# Altium PCB Sampler.PCBDOC (part 5 of 7)
Units mil, origin at the board's own origin, x right, y up, seen from the top; angles counter-clockwise.
Board outline 6299 x 3937 mil, 4 copper layers (Top, GP1(GND), L3, Bot), stack 64.883 mil thick; 567 components, 323 nets, 1698 pads, 817 vias.
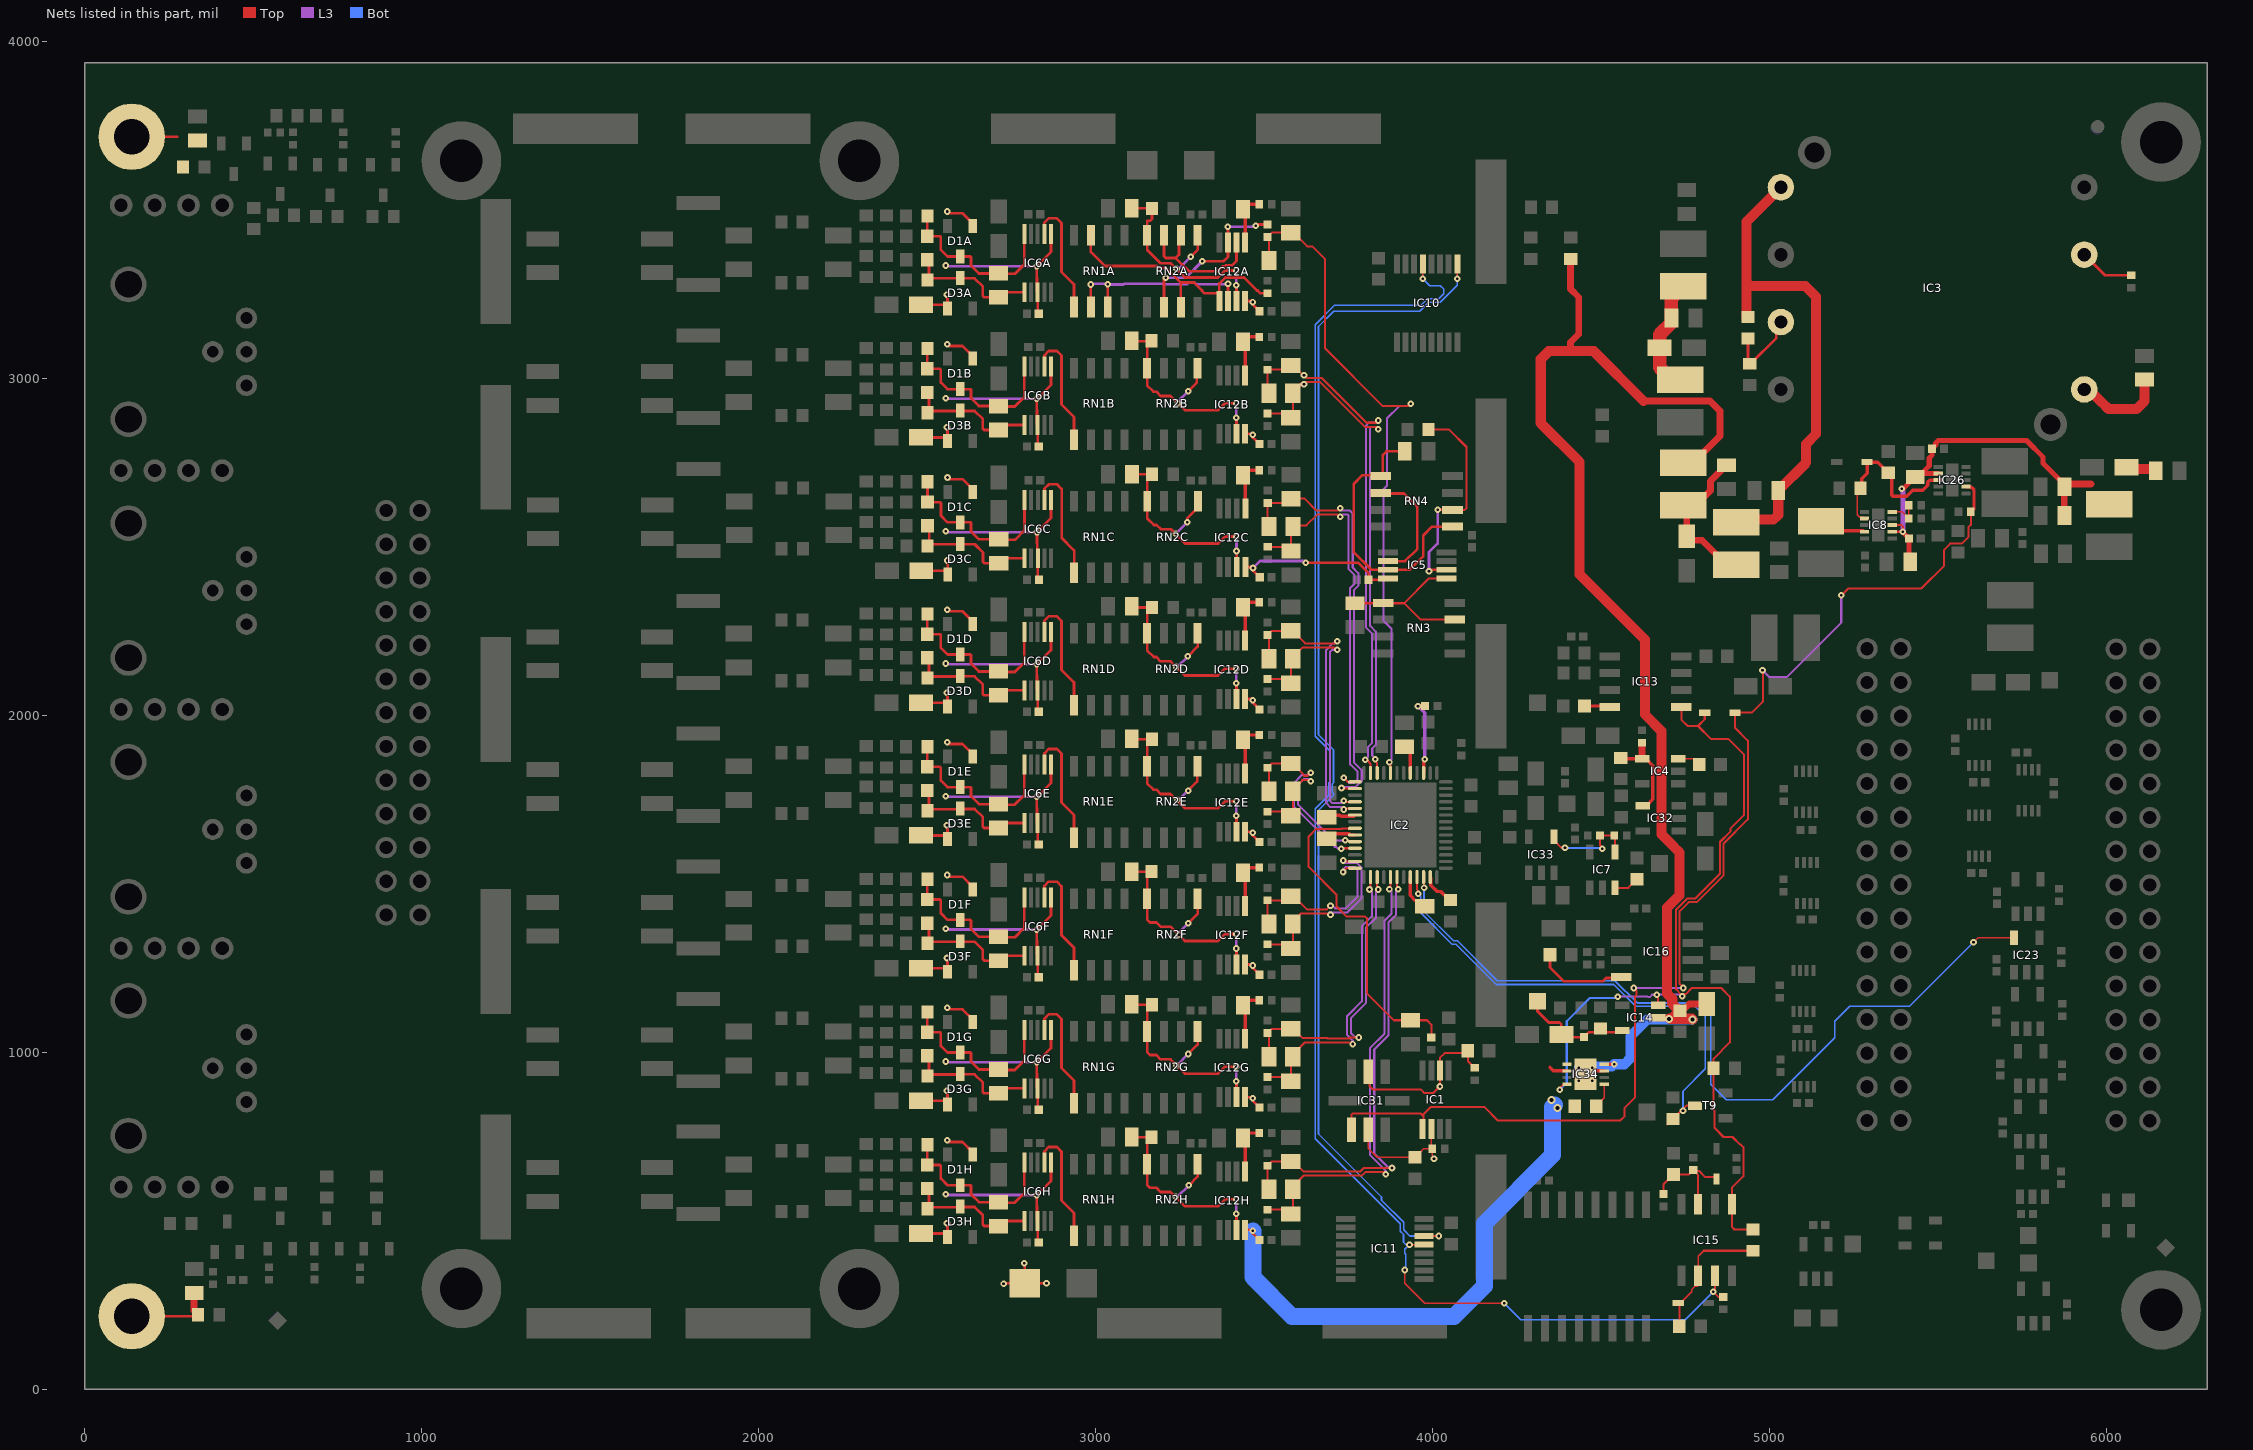
[diagram p6: the nets of this part, all layers, seen from the top]

## Via types
v1: diameter 19.68, hole 7.87, Top to Bot, tented both sides, 772 vias
v2: diameter 23.62, hole 11.81, Top to Bot, tented both sides, 17 vias
v3: diameter 19.68, hole 7.87, Top to Bot, 11 vias
v4: diameter 39.37, hole 23.62, Top to Bot, tented both sides, 7 vias
v5: diameter 23.62, hole 11.81, Top to Bot, 6 vias
v6: diameter 50, hole 28, Top to Bot, 4 vias

## Nets (pads, with @x,y where several pads share a name; then routed paths per layer and width w, separated by ;. In a path a pad name is that pad's centre, name@x,y a point inside that pad or via, vN(x,y) a via of type N, cw(c..) or ccw(c..) an arc to the next point about the centre after c; other vN are vias at no path point) (continued)
IN_0_P: C17A.1 C25A.1 IC2.48 R16A.2 | length 2032.5
  Top w6: C17A.1@3514.14,3349.46 3514.14,3415.6 R16A.2@3510.2,3419.54 3522.8,3432.13 C25A.1@3579.1,3432.13 3587.55,3432.13 3627.76,3391.92 3643.31,3391.92 3681.29,3353.94 3681.29,3088.63 3852.41,2917.51 3928.2,2917.51 v1(3935.04,2924.35) ; v1(3871.8,1861.22) 3874.8,1858.22 IC2.48@3874.8,1829.15
  L3 w6: v1(3871.8,1861.22) 3878.65,1868.06 3878.65,2256.2 3857.28,2277.56 3853.77,2281.07 3853.77,2670.94 3857.28,2674.45 3864.17,2681.34 3864.17,2880.95 3900.73,2917.51 3928.2,2917.51 v1(3935.04,2924.35)
IN_1_N: C17B.2 C23B.2 IC2.50 R14B.2 | length 1551.6
  Top w6: R14B.2@3510.2,2895.52 3566.5,2895.52 C23B.2@3579.1,2882.92 3585.01,2888.83 C17B.2@3585.01,2955.76 3607.28,2978.03 3607.28,2984.25 3617.49,2984.25 3618.29,2983.45 v1(3618.29,2982.43) 3625.5,2989.64 3665.35,2989.64 3798.7,2856.3 3831.74,2856.3 v1(3838.58,2849.46) ; v1(3829.72,1869.5) 3829.72,1863.93 3835.43,1858.22 IC2.50@3835.43,1829.15
  L3 w6: v1(3829.72,1869.5) 3829.72,1872.05 3820.87,1880.91 3820.87,1901.68 3831.59,1912.4 3831.59,2248.37 3814.54,2265.42 3814.54,2854.89 3815.94,2856.3 3831.74,2856.3 v1(3838.58,2849.46)
IN_1_P: C17B.1 C25B.1 IC2.51 R16B.2 | length 1576.6
  Top w6: C17B.1@3514.14,2955.76 3510.2,2959.69 R16B.2@3510.2,3025.83 3560.28,3025.83 3572.88,3038.43 C25B.1@3579.1,3038.43 3586.57,3038.43 3614.17,3010.83 3616.5,3010.83 v1(3618.47,3008.86) 3625.69,3001.64 3670.32,3001.64 3803.67,2868.3 3831.74,2868.3 v1(3838.58,2875.14) ; v1(3800.2,1868.11) 3805.86,1868.11 3810.88,1863.09 3810.88,1861.7 3815.75,1856.83 IC2.51@3815.75,1829.15
  L3 w6: v1(3800.2,1868.11) 3808.87,1876.78 3808.87,1906.65 3819.59,1917.37 3819.59,2243.4 3802.54,2260.45 3802.54,2859.86 3810.97,2868.3 3831.74,2868.3 v1(3838.58,2875.14)
IN_2_N: C17C.2 C23C.2 IC2.1 R14C.2 | length 1245.5
  Top w6: R14C.2@3510.7,2500.09 3567,2500.09 C23C.2@3579.6,2487.5 3579.6,2554.43 C17C.2@3585.5,2560.33 3585.5,2571.72 3593.25,2563.98 3625.45,2563.98 3657.35,2595.87 3718.55,2595.87 v1(3725.39,2589.03) ; v1(3736.22,1814.96) 3748.03,1803.15 3748.03,1802.57 IC2.1@3769.49,1802.57
  L3 w6: v1(3725.39,2589.03) 3732.24,2595.87 3749.02,2595.87 3750.98,2593.9 3750.98,2433.82 3767.72,2417.08 3767.72,2389.76 3758.86,2380.91 3755.34,2377.39 3755.34,1854.97 3777.62,1832.69 3777.62,1810.71 3765.65,1798.73 3752.45,1798.73 v1(3736.22,1814.96)
IN_2_P: C17C.1 C25C.1 IC2.2 R16C.2 | length 1277.2
  Top w6: C17C.1@3514.64,2560.33 3510.7,2564.27 R16C.2@3510.7,2630.41 3567,2630.41 C25C.1@3579.6,2643.01 3620.01,2643.01 3655.15,2607.87 3718.55,2607.87 v1(3725.39,2614.71) ; v1(3729.51,1784.54) 3735.61,1784.54 3737.25,1782.89 IC2.2@3769.49,1782.89
  L3 w6: v1(3725.39,2614.71) 3732.24,2607.87 3753.99,2607.87 3762.98,2598.87 3762.98,2438.79 3779.72,2422.06 3779.72,2384.79 3767.34,2372.42 3767.34,1859.94 3789.69,1837.6 3789.69,1805.8 3770.62,1786.73 3731.71,1786.73 v1(3729.51,1784.54)
IN_3_N: C17D.2 C23D.2 IC2.4 R14D.2 | length 845.9
  Top w6: R14D.2@3510.2,2108.12 3566.5,2108.12 C23D.2@3579.1,2095.52 3579.1,2162.45 C17D.2@3585.01,2168.35 3585.01,2171.62 3614.97,2201.58 3709.69,2201.58 v1(3716.54,2194.74) ; v1(3736.22,1746.52) 3739.22,1743.52 IC2.4@3769.49,1743.52
  L3 w6: v1(3716.54,2194.74) 3701.82,2194.74 3695.87,2188.79 3695.87,1745.58 3701.77,1739.68 3729.38,1739.68 v1(3736.22,1746.52)
IN_3_P: C17D.1 C25D.1 IC2.5 R16D.2 | length 893.5
  Top w6: C17D.1@3514.14,2168.35 3514.14,2234.5 R16D.2@3510.2,2238.43 3522.8,2251.03 C25D.1@3579.1,2251.03 3584.6,2251.03 3622.05,2213.58 3709.69,2213.58 v1(3716.54,2220.43) ; v1(3736.22,1720.83) 3739.22,1723.83 IC2.5@3769.49,1723.83
  L3 w6: v1(3716.54,2220.43) 3709.69,2213.58 3703.69,2213.58 3683.87,2193.76 3683.87,1740.61 3696.8,1727.68 3729.38,1727.68 v1(3736.22,1720.83)
IN_4_N: C17E.2 C23E.2 IC2.10 R14E.2 | length 513.1
  Top w6: R14E.2@3510.2,1714.42 3566.5,1714.42 C23E.2@3579.1,1701.82 3585.01,1707.72 C17E.2@3585.01,1774.65 3585.01,1778.91 3614.17,1808.07 ; 3613.14,1808.07 3614.17,1808.07 ; v1(3638.78,1804.18) 3634.89,1808.07 3614.17,1808.07
  L3 w6: v1(3638.78,1804.18) 3631.94,1811.02 3617.13,1811.02 3600.27,1794.17 3600.27,1735.87 3707.12,1629.02 v1(3740.34,1629.02)
IN_4_P: C17E.1 C25E.1 IC2.11 R16E.2 | length 590.6
  Top w6: C17E.1@3514.14,1774.65 3514.14,1840.8 R16E.2@3510.2,1844.73 3522.8,1857.33 C25E.1@3579.1,1857.33 3583.61,1857.33 3619.09,1821.85 3619.09,1820.87 3628.82,1820.87 3637.82,1829.87 v1(3638.78,1829.87) ; v1(3728.53,1604.41) 3729.84,1605.72 IC2.11@3769.49,1605.72
  L3 w6: v1(3638.78,1829.87) 3631.94,1823.02 3612.16,1823.02 3588.27,1799.14 3588.27,1730.9 3709.6,1609.57 3713.58,1609.57 3718.74,1604.41 v1(3728.53,1604.41)
IN_5_N: C17F.2 C23F.2 IC2.13 R14F.2 | length 586.1
  Top w6: R14F.2@3510.2,1320.72 3566.5,1320.72 C23F.2@3579.1,1308.12 3585.01,1314.02 C17F.2@3585.01,1380.95 3585.01,1389.14 3608.08,1412.21 3690.99,1412.21 3692.17,1413.39 v1(3697.03,1408.53) ; v1(3735.24,1569.35) 3738.24,1566.35 IC2.13@3769.49,1566.35
  L3 w6: v1@3692.17,1413.39 3693.95,1415.17 3747.1,1415.17 3789.56,1457.63 3789.56,1547.41 3774.46,1562.51 3742.08,1562.51 v1(3735.24,1569.35)
IN_5_P: C17F.1 C25F.1 IC2.14 R16F.2 | length 559.9
  Top w6: C17F.1@3514.14,1380.95 3510.2,1384.89 R16F.2@3510.2,1451.03 3566.5,1451.03 C25F.1@3579.1,1463.63 3587.55,1463.63 3626.97,1424.21 3686.02,1424.21 v1(3696.85,1435.04) ; v1(3734.25,1535.43) 3745.49,1546.67 IC2.14@3769.49,1546.67
  L3 w6: v1(3696.85,1435.04) 3702.76,1435.04 3710.63,1427.17 3742.13,1427.17 3777.56,1462.6 3777.56,1542.44 3769.49,1550.51 3742.08,1550.51 3734.25,1542.69 v1(3734.25,1535.43)
IN_6_N: C17G.2 C23G.2 IC2.16 R14G.2 | length 888.4
  Top w6: R14G.2@3510.2,927.02 3566.5,927.02 C23G.2@3579.1,914.42 3579.1,981.35 C17G.2@3585.01,987.25 3585.01,993.47 3620.87,1029.34 3687.99,1029.34 3688.48,1029.83 3757.8,1029.83 v1(3762.98,1024.66) ; v1(3812.75,1483.27) 3815.75,1486.27 IC2.16@3815.75,1520.09
  L3 w6: v1(3762.98,1024.66) 3762.98,1034.87 3748.83,1049.02 3745.31,1052.54 3745.31,1106.53 3748.83,1110.05 3790.17,1151.39 3790.17,1374.24 3819.59,1403.67 3819.59,1476.43 v1(3812.75,1483.27)
IN_6_P: C17G.1 C25G.1 IC2.17 R16G.2 | length 886.4
  Top w6: C17G.1@3514.14,987.25 3514.14,1053.39 R16G.2@3510.2,1057.33 3522.8,1069.93 C25G.1@3579.1,1069.93 3587.55,1069.93 3615.16,1042.32 3687.99,1042.32 3688.48,1041.83 3752.95,1041.83 3754.62,1043.5 3779.85,1043.5 v1(3780.7,1044.34) ; IC2.17@3835.43,1520.09 3835.43,1486.27 v1(3838.43,1483.27)
  L3 w6: v1(3780.7,1044.34) 3770.48,1044.34 3757.31,1057.51 3757.31,1101.56 3802.17,1146.42 3802.17,1369.27 3831.59,1398.7 3831.59,1476.43 v1(3838.43,1483.27)
IN_7_N: C17H.2 C23H.2 IC2.19 R14H.2 | length 1385.9
  Top w6: R14H.2@3510.2,533.31 3566.5,533.31 C23H.2@3579.1,520.72 3585.01,526.62 C17H.2@3585.01,593.55 3585.01,601.74 3618.38,635.11 3790.86,635.11 3801.37,645.62 3854.38,645.62 v1(3861.22,638.78) ; v1(3871.8,1484.25) 3874.8,1487.25 IC2.19@3874.8,1520.09
  L3 w6: v1(3861.22,638.78) 3861.22,648.46 3814.77,694.91 3814.77,1013.59 3857.09,1055.91 3857.09,1390.56 3878.65,1412.11 3878.65,1477.41 v1(3871.8,1484.25)
IN_7_P: C17H.1 C25H.1 IC2.20 R16H.2 | length 1384
  Top w6: C17H.1@3514.14,593.55 3510.2,597.49 R16H.2@3510.2,663.63 3522.8,676.23 C25H.1@3579.1,676.23 3582.1,673.23 3590.55,673.23 3616.67,647.11 3785.89,647.11 3796.4,657.62 3869.03,657.62 3869.71,656.94 v1(3879.38,656.94) ; IC2.20@3894.49,1520.09 3894.49,1487.25 v1(3897.49,1484.25)
  L3 w6: v1(3879.38,656.94) 3869.71,656.94 3826.77,699.88 3826.77,1008.62 3869.09,1050.94 3869.09,1385.59 3890.65,1407.14 3890.65,1477.41 v1(3897.49,1484.25)
N12V0A: C11A.2 C11B.2 C11C.2 C11D.2 C11E.2 C11F.2 C11G.2 C11H.2 C22.2 C41A.2 C41B.2 C41C.2 C41D.2 C41E.2 C41F.2 C41G.2 C41H.2 C46.2 C52.2 C71A.2 C71B.2 C71C.2 C71D.2 C71E.2 C71F.2 C71G.2 C71H.2 C83.2 D1A.1 D1B.1 D1C.1 D1D.1 D1E.1 D1F.1 D1G.1 D1H.1 D3A.1 D3B.1 D3C.1 D3D.1 D3E.1 D3F.1 D3G.1 D3H.1 D9.2 IC5.4 IC6A.3 IC6A.6 IC6B.3 IC6B.6 IC6C.3 IC6C.6 IC6D.3 IC6D.6 IC6E.3 IC6E.6 IC6F.3 IC6F.6 IC6G.3 IC6G.6 IC6H.3 IC6H.6 IC12A.4 IC12B.4 IC12C.4 IC12D.4 IC12E.4 IC12F.4 IC12G.4 IC12H.4 IC14.5 IC34.1 IC34.2 R32.2 TP9.1 | length 9093.8
  Top w8: C11H.2@2482.28,462.6 2549.82,462.6 D3H.1@2560.6,451.82 2560.6,491.19 v1(2559.06,492.73) ; C11G.2@2482.28,856.3 2549.82,856.3 D3G.1@2560.6,845.52 2560.6,884.89 v1(2559.06,886.43) ; C11F.2@2482.28,1250 2549.82,1250 D3F.1@2560.6,1239.22 2560.6,1278.59 v1(2559.06,1280.13) ; C11E.2@2482.28,1643.7 2549.82,1643.7 D3E.1@2560.6,1632.92 2560.6,1672.29 v1(2559.06,1673.83) ; C11D.2@2482.28,2037.4 2549.82,2037.4 D3D.1@2560.6,2026.62 2560.6,2065.99 v1(2559.06,2067.54) ; C11B.2@2482.28,2824.8 2549.82,2824.8 D3B.1@2560.6,2814.02 2560.6,2853.39 v1(2559.06,2854.94) ; C11A.2@2482.28,3218.5 2549.82,3218.5 D3A.1@2560.6,3207.72 2560.6,3247.09 v1(2559.06,3248.64) ; C11C.2@2482.78,2429.38 2550.31,2429.38 D3C.1@2561.09,2418.6 2561.09,2457.97 v1(2559.55,2459.51) ; v1(2560,739.09) 2565,734.09 2605,734.09 2635.4,703.69 D1H.1@2635.4,699.24 ; v1(2560,1132.8) 2565,1127.8 2605,1127.8 2635.4,1097.39 D1G.1@2635.4,1092.95 ; v1(2560,1526.5) 2565,1521.5 2605,1521.5 2635.4,1491.09 D1F.1@2635.4,1486.65 ; v1(2560,1920.2) 2565,1915.2 2605,1915.2 2635.4,1884.79 D1E.1@2635.4,1880.35 ; v1(2560,2313.9) 2565,2308.9 2605,2308.9 2635.4,2278.5 D1D.1@2635.4,2274.05 ; v1(2560,3101.3) 2565,3096.3 2605,3096.3 2635.4,3065.9 D1B.1@2635.4,3061.45 ; v1(2560,3495) 2565,3490 2605,3490 2635.4,3459.6 D1A.1@2635.4,3455.15 ; v1(2560.49,2705.87) 2565.49,2700.87 2605.49,2700.87 2635.9,2670.47 D1C.1@2635.9,2666.03 ; D1H.1@2635.4,696.37 D1H.1@2635.4,699.24 ; D1G.1@2635.4,1090.07 D1G.1@2635.4,1092.95 ; D1F.1@2635.4,1483.77 D1F.1@2635.4,1486.65 ; D1E.1@2635.4,1877.47 D1E.1@2635.4,1880.35 ; D1D.1@2635.4,2271.17 D1D.1@2635.4,2274.05 ; D1B.1@2635.4,3058.57 D1B.1@2635.4,3061.45 ; D1A.1@2635.4,3452.28 D1A.1@2635.4,3455.15 ; D1C.1@2635.9,2663.15 D1C.1@2635.9,2666.03 ; D1H.1@2638.23,701.09 2635.89,698.76 D1H.1@2635.4,699.24 ; D1G.1@2638.23,1094.8 2635.89,1092.46 D1G.1@2635.4,1092.95 ; D1F.1@2638.23,1488.5 2635.89,1486.16 D1F.1@2635.4,1486.65 ; D1E.1@2638.23,1882.2 2635.89,1879.86 D1E.1@2635.4,1880.35 ; D1D.1@2638.23,2275.9 2635.89,2273.56 D1D.1@2635.4,2274.05 ; D1B.1@2638.23,3063.3 2635.89,3060.96 D1B.1@2635.4,3061.45 ; D1A.1@2638.23,3457 2635.89,3454.66 D1A.1@2635.4,3455.15 ; D1C.1@2638.72,2667.87 2636.38,2665.54 D1C.1@2635.9,2666.03 ; v1(2726.87,313.24) 2728.59,314.96 D9.2@2789.37,314.96 ; v1(2788.39,374.02) 2788.39,375 2789.37,374.02 D9.2@2789.37,314.96 ; C41H.2@2825.64,441.66 C41H.2@2828,439.3 ; C41G.2@2825.64,835.36 C41G.2@2828,833 ; C41F.2@2825.64,1229.06 C41F.2@2828,1226.7 ; C41E.2@2825.64,1622.76 C41E.2@2828,1620.4 ; C41D.2@2825.64,2016.47 C41D.2@2828,2014.1 ; C41B.2@2825.64,2803.87 C41B.2@2828,2801.5 ; C41A.2@2825.64,3197.57 C41A.2@2828,3195.2 ; C41C.2@2826.13,2408.44 C41C.2@2828.49,2406.08 ; C41H.2@2831.54,435.76 C41H.2@2828,439.3 ; C41G.2@2831.54,829.46 C41G.2@2828,833 ; C41F.2@2831.54,1223.16 C41F.2@2828,1226.7 ; C41E.2@2831.54,1616.86 C41E.2@2828,1620.4 ; C41D.2@2831.54,2010.56 C41D.2@2828,2014.1 ; C41B.2@2831.54,2797.96 C41B.2@2828,2801.5 ; C41A.2@2831.54,3191.66 C41A.2@2828,3195.2 ; C41C.2@2832.04,2402.54 C41C.2@2828.49,2406.08 ; v1(2854.33,314.96) D9.2@2789.37,314.96 ; IC6H.6@2867.37,672.71 2867.37,618.76 v1(2825.64,577.02) 2825.64,544.09 2826.1,543.63 2826.1,501.38 IC6H.3@2828,499.48 C41H.2@2828,439.3 ; IC6G.6@2867.37,1066.41 2867.37,1012.46 v1(2825.64,970.72) 2825.64,937.8 2826.1,937.33 2826.1,895.08 IC6G.3@2828,893.18 C41G.2@2828,833 ; IC6F.6@2867.37,1460.11 2867.37,1406.16 v1(2825.64,1364.42) 2825.64,1331.5 2826.1,1331.03 2826.1,1288.78 IC6F.3@2828,1286.88 C41F.2@2828,1226.7 ; IC6E.6@2867.37,1853.81 2867.37,1799.86 v1(2825.64,1758.12) 2825.64,1725.2 2826.1,1724.73 2826.1,1682.48 IC6E.3@2828,1680.58 C41E.2@2828,1620.4 ; IC6D.6@2867.37,2247.51 2867.37,2193.56 v1(2825.64,2151.83) 2825.64,2118.9 2826.1,2118.43 2826.1,2076.18 IC6D.3@2828,2074.28 C41D.2@2828,2014.1 ; IC6B.6@2867.37,3034.92 2867.37,2980.96 v1(2825.64,2939.23) 2825.64,2906.3 2826.1,2905.84 2826.1,2863.59 IC6B.3@2828,2861.69 C41B.2@2828,2801.5 ; IC6A.6@2867.37,3428.61 2867.37,3374.66 v1(2825.64,3332.93) 2825.64,3300 2826.1,3299.54 2826.1,3257.29 IC6A.3@2828,3255.39 C41A.2@2828,3195.2 ; IC6C.6@2867.86,2639.49 2867.86,2585.54 v1(2826.13,2543.8) 2826.13,2510.87 2826.59,2510.41 2826.59,2468.16 IC6C.3@2828.49,2466.26 C41C.2@2828.49,2406.08 ; IC12H.4@3443.9,473.57 3463.44,473.57 v1(3466.54,470.47) 3466.54,462.6 C71H.2@3486.22,442.91 ; IC12G.4@3443.9,867.27 3463.44,867.27 v1(3466.54,864.17) 3466.54,856.3 C71G.2@3486.22,836.61 ; IC12F.4@3443.9,1260.97 3463.44,1260.97 v1(3466.54,1257.87) 3466.54,1250 C71F.2@3486.22,1230.31 ; IC12E.4@3443.9,1654.67 3463.44,1654.67 v1(3466.54,1651.57) 3466.54,1643.7 C71E.2@3486.22,1624.02 ; IC12D.4@3443.9,2048.37 3463.44,2048.37 v1(3466.54,2045.28) 3466.54,2037.4 C71D.2@3486.22,2017.72 ; IC12B.4@3443.9,2835.77 3463.44,2835.77 v1(3466.54,2832.68) 3466.54,2824.8 C71B.2@3486.22,2805.12 ; IC12A.4@3443.9,3229.47 3463.44,3229.47 v1(3466.54,3226.38) 3466.54,3218.5 C71A.2@3486.22,3198.82 ; IC12C.4@3444.39,2440.35 3463.93,2440.35 v1(3467.03,2437.25) 3467.03,2429.38 C71C.2@3486.71,2409.69 ; v1(3623.03,2452.76) 3779.53,2452.76 3811.02,2421.26 3810.04,2420.28 C22.2@3810.04,2402.56 3864.17,2402.56 IC5.4@3868.11,2406.5 ; TP9.1@4311.02,1151.57 4311.02,1122.05 4344.49,1088.58 4375.98,1088.58 4381.89,1082.68 C52.2@4381.89,1053.15 4389.76,1045.28 C46.2@4448.82,1045.28 4463.05,1059.5 4552.53,1059.5 IC14.5@4557.99,1064.96
  Top w10: 4348.42,955.72 4348.42,954.87 4358.27,945.03 IC34.2@4398.62,945.03
  L3 w8: v1(2555,579.09) 2557.07,577.02 v1(2825.64,577.02) ; v1(2555,972.8) 2557.07,970.72 v1(2825.64,970.72) ; v1(2555,1366.5) 2557.07,1364.42 v1(2825.64,1364.42) ; v1(2555,1760.2) 2557.07,1758.12 v1(2825.64,1758.12) ; v1(2555,2153.9) 2557.07,2151.83 v1(2825.64,2151.83) ; v1(2555,2941.3) 2557.07,2939.23 v1(2825.64,2939.23) ; v1(2555,3335) 2557.07,3332.93 v1(2825.64,3332.93) ; v1(2555.49,2545.87) 2557.57,2543.8 v1(2826.13,2543.8) ; v1(3467.03,2437.25) 3487.84,2458.06 3617.72,2458.06 v1(3623.03,2452.76)
  Bot w50: v1(3466.54,470.47) 3466.54,332.68 3583.15,216.06 4063.25,216.06 4153.54,306.36 4153.54,492.62 4356.05,695.13 4356.05,838.33 4361.22,843.5
  other v2: 4371.11,834.99 4352.36,859.33
N13V0: C19.2 C44.2 IC14.2 IC34.7 IC34.8 IC34.9 L13.2 R6.2 | length 3985.7
  Top w10: v3(4473.43,954.87) 4473.43,952.82 4481.22,945.03 IC34.7@4508.86,945.03 ; IC34.8@4508.86,964.71 v1(4538.58,964.71)
  Top w20: 4409.45,3080.71 4409.45,3107.18 4433.54,3131.27 4433.54,3240.77 4409.45,3264.87 R6.2@4409.45,3354.33 ; 4625.98,2933.07 4822.83,2933.07 4852.36,2903.54 4852.36,2828.74 4773.62,2750 L13.2@4744.09,2750 ; IC14.2@4669.29,1102.36 v2@4703.74,1102.36 ; C44.2@4735.24,1124.02 4741.82,1124.02 4761.5,1143.7 C19.2@4812.99,1143.7
  Top w30: 4625.98,2933.07 4478.35,3080.71 4409.45,3080.71 4344.49,3080.71 4320.87,3057.09 4320.87,2867.13 4435.71,2752.28 4435.71,2418.62 4629.92,2224.41 4629.92,2002.67 4679.38,1953.21 4679.38,1647.05 4717.95,1608.47 4717.95,1608.02 4732.28,1593.69 4732.28,1466.21 4695.41,1429.33 4695.41,1174.41 4710.94,1158.87 4710.94,1144.73 4731.66,1124.02 4733.27,1124.02 4709.65,1100.39 4703.74,1100.39 4704.41,1099.72 4769.6,1099.72 v2(4771.53,1097.79)
  Bot w30: v3(4434.06,954.87) v3(4473.43,954.87) v3@4473.43,962.74 ; 4487.18,958.55 4532.42,958.55 v1(4538.58,964.71) 4569.04,964.71 4586.61,982.29 4586.61,1047.41 4636.99,1097.79 v2(4771.53,1097.79)
  other v2: 4701.67,1098.63
  other v3: 4434.06,915.5 4473.43,915.5
N13V0S: C40.2 IC3.4 L12.1 R19.1 | length 1683.1
  Top w8: L12.1@4901.58,2572.83 5003.94,2572.83 5011.81,2580.71 5019.68,2588.58 5019.68,2661.42 C40.2@5025.59,2667.32
  Top w30: L12.1@4901.58,2572.83 4909.45,2580.71 5011.81,2580.71 ; R19.1@4931.1,3181.1 4933.82,3183.82 R19.1@4935.79,3183.82 ; R19.1@4935.79,3181.86 4933.82,3181.86 4932.84,3182.84 4931.1,3184.58 4931.1,3285.43 ; 5019.68,2588.58 5025.59,2594.49 C40.2@5025.59,2667.32 5108.27,2750 5108.27,2805.12 5137.8,2834.65 5137.8,3242.32 5106.5,3273.62 4942.91,3273.62 4931.1,3285.43 ; IC3.4@5033.46,3567.13 4931.1,3464.76 4931.1,3285.43
NetB1_1: B1.1 C78.1 R75.2 | length 134.1
  Top w8: B1.1@140,3717 274.14,3717
NetB2_1: B2.1 C79.1 R76.2 | length 268.4
  Top w8: B2.1@140,217 332.22,217 R76.2@336.68,221.46
  Top w20: C79.1@324.8,286.42 324.8,233.33 R76.2@336.68,221.46
NetC1_2: C1.2 IC1.2 IC31.2 R15.2 | length 358.7
  Top w5: IC31.2@3809.06,769.83 3809.06,714.76 3835.38,688.44 3948.62,688.44 3964.82,704.64 3964.82,705.62 3973.11,713.91 R15.2@3992.91,713.91 ; IC1.2@3996.06,772.64 3996.06,717.06 R15.2@3992.91,713.91 ; v1(4003.94,684.2) 4003.94,688.18 3998.73,693.38 R15.2@3998.73,713.91 R15.2@3992.91,713.91
NetC12_2: C12.2 IC2.8 R1.2 | length 984.7
  Top w6: IC2.8@3769.49,1664.78 3732.12,1664.78 3730.31,1662.98 3654.17,1662.98 3631.89,1640.7 3631.89,1550.82 3714.69,1468.02 3714.69,1432.94 3744.87,1402.77 3800.02,1402.77 3804.71,1398.09 3804.71,1175.61 3884.97,1095.35 C12.2@3934.24,1095.35 3983.39,1095.35 3996.24,1082.5 R1.2@3996.24,1044.42
NetC13_2: C13.2 IC2.22 | length 95.8
  Top w10: IC2.22@3933.86,1520.09 3933.86,1465.77 3949.02,1450.6 3962.55,1450.6 C13.2@3967.17,1445.98
NetC14_2: C14.2 IC2.9 | length 91.5
  Top w10: C14.2@3686.02,1633.32 3701.56,1648.86 3752.14,1648.86 3755.91,1645.09 IC2.9@3769.49,1645.09
NetC15_2: C15.2 IC2.6 | length 88.9
  Top w10: C15.2@3686.02,1697.46 3692.72,1704.15 3724.84,1704.15 3728,1700.99 3766.33,1700.99 IC2.6@3769.49,1704.15
NetC16_2: C16.2 IC2.45 | length 85.3
  Top w10: C16.2@3916.17,1907.12 3933.86,1889.43 IC2.45@3933.86,1829.15
NetC18_2: C18.2 C42.2 L12.2 L13.1 | length 472.3
  Top w20: L13.1@4744.09,2624.02 L13.1@4763.78,2624.02 ; C42.2@4872.05,2742.13 4824.8,2694.88 4824.8,2667.32 4781.5,2624.02 L13.1@4763.78,2624.02 ; L12.2@4901.58,2446.85 4872.05,2446.85 4799.21,2519.68 4765.75,2519.68 C18.2@4753.94,2531.5 4753.94,2614.17 L13.1@4763.78,2624.02
NetC27_2: C27.2 C28.1 L10.2 L11.1 | length 346.6
  Top w40: L11.1@4734.25,2996.06 4709.65,2996.06 4673.23,3032.48 C28.1@4673.23,3090.55 4673.23,3129.92 4708.66,3165.35 C27.2@4708.66,3179.13 4708.66,3238.19 L10.2@4744.09,3273.62
NetC32_2: C32.2 C34.2 C36.2 C39.2 C49.1 C63.2 C64.2 C122.2 C123.2 IC3.1 IC8.2 IC8.3 IC26.2 L6.2 | length 1543.4
  Top w6: IC8.2@5364.05,2544.87 v1(5395.15,2544.87) 5395.15,2561.02 5391.61,2564.56 IC8.3@5364.05,2564.56
  Top w15: v1(5391.6,2672.82) 5396.82,2672.82 C123.2@5431.69,2707.69 5440.97,2707.69 C123.2@5451.17,2717.9 ; v1(5395.15,2544.87) 5395.15,2543.3 C63.2@5413.26,2525.19 5413.26,2460.23 C64.2@5417.2,2456.29 ; IC26.2@5499.94,2717.9 C123.2@5451.17,2717.9 ; C36.2@5874.37,2678 5874.37,2684.89 5811.66,2747.6 5811.66,2766.1 5762.11,2815.64 5500.21,2815.64 5492.89,2808.32 5492.89,2801.67 C122.2@5482.16,2790.94 5482.16,2772.24 5473.66,2763.74 5473.66,2740.38 C123.2@5451.17,2717.9
  Top w20: C39.2@5874.37,2593 C36.2@5874.37,2678 5882.7,2686.33 5953.37,2686.33
  Top w30: IC3.1@5933.46,2967.13 5946.65,2967.13 5983.9,2929.87 5984.79,2929.87 6006,2908.66 6088.55,2908.66 6112.2,2932.31 C32.2@6112.2,2996.06 ; C49.1@6048.39,2736.22 C49.1@6059.21,2736.22 6064.13,2731.3 6140.75,2731.3 C34.2@6145.67,2726.38
  L3 w15: v1(5391.6,2672.82) 5391.6,2671.55 5395.15,2668 v1(5395.15,2544.87)
NetC47_1: C47.1 IC7.3 | length 75.6
  Top w6: IC7.3@4541.36,1488.16 4580.68,1488.16 C47.1@4606.3,1513.78
NetC65_1: C65.1 IC13.4 | length 75.7
  Top w8: C65.1@4450.79,2027.56 4523.37,2027.56 IC13.4@4525.55,2025.37
NetC66_2: C66.2 D5.2 IC15.6 R52.1 | length 411.6
  Top w5: C66.2@4732.28,187.01 4732.28,252.36 D5.2@4728.74,255.91 4735.24,255.91 4769.07,289.74 4769.07,296.55 4779.23,306.71 4786.04,306.71 4787.99,308.66 IC15.6@4787.99,336.61 4787.99,395.28 4804.13,411.42
  Top w6: 4804.13,411.42 R52.1@4950.79,411.42
NetC68_2: C68.2 D2.2 IC15.3 R22.2 R48.2 | length 317.8
  Top w6: R48.2@4685.04,579.53 4685.04,608.27 C68.2@4714.57,637.8 4760.63,637.8 R22.2@4773.62,650.79 ; IC15.3@4787.99,549.21 4787.99,635.24 4774.61,648.62 4790.35,648.62 4809.06,629.92 4837.01,629.92 D2.2@4842.52,624.41
NetC69_2: C69.2 D4.2 IC8.7 IC26.3 R56.1 | length 514.1
  Top w5: R56.1@5269.56,2673.81 5270.54,2672.83 5273,2672.83 5275.46,2672.83 5273,2670.37 5260.09,2657.45 5260.09,2594.92 5267.36,2587.65 5277.96,2587.65 IC8.7@5281.37,2584.24
  Top w10: R56.1@5269.56,2673.81 5272.02,2676.27 5273.78,2678.03 5273.78,2702.64 5289.13,2717.98 5289.13,2751.29 D4.2@5288.85,2751.57 ; D4.2@5289.13,2751.57 5320.74,2751.57 C69.2@5352.24,2720.07 5362.08,2710.23 5362.08,2653.14 5365.11,2650.11 5406.79,2650.11 5424.75,2668.06 5454.43,2668.06 5469.25,2682.88 5469.25,2692.51 5474.95,2698.21 IC26.3@5499.94,2698.21
NetC72A_1: C72A.1 C88A.2 D3A.3 IC6A.1 R42A.2 | length 381.5
  Top w8: C88A.2@2505.43,3347.24 2505.43,3296.69 2596.42,3296.69 D3A.3@2596.66,3296.94 ; D3A.3@2598,3298.27 D3A.3@2596.66,3296.94 ; IC6A.1@2788.63,3255.39 2726.82,3255.39 C72A.1@2712,3240.57 2669.49,3240.57 2665.27,3244.79 2665.27,3272.61 2640.94,3296.94 D3A.3@2596.66,3296.94
NetC72A_2: C72A.2 C85A.2 D1A.3 IC6A.10 R34A.2 | length 532.7
  Top w8: R34A.2@2500.71,3481.97 C85A.2@2500.71,3421.97 2537.76,3421.97 2540.91,3418.81 2540.91,3381.41 2560.6,3361.72 D1A.3@2598,3361.72 2628.28,3361.72 2630,3360 2630,3335 2653.57,3311.43 C72A.2@2712,3311.43 2713.43,3310 2760,3310 2788.63,3338.63 IC6A.10@2788.63,3428.61
NetC72B_1: C72B.1 C88B.2 D3B.3 IC6B.1 R42B.2 | length 381.5
  Top w8: C88B.2@2505.43,2953.54 2505.43,2902.99 2596.42,2902.99 D3B.3@2596.66,2903.24 ; D3B.3@2598,2904.57 D3B.3@2596.66,2903.24 ; IC6B.1@2788.63,2861.69 2726.82,2861.69 C72B.1@2712,2846.87 2669.49,2846.87 2665.27,2851.08 2665.27,2878.91 2640.94,2903.24 D3B.3@2596.66,2903.24
NetC72B_2: C72B.2 C85B.2 D1B.3 IC6B.10 R34B.2 | length 532.7
  Top w8: R34B.2@2500.71,3088.27 C85B.2@2500.71,3028.27 2537.76,3028.27 2540.91,3025.11 2540.91,2987.71 2560.6,2968.02 D1B.3@2598,2968.02 2628.28,2968.02 2630,2966.3 2630,2941.3 2653.57,2917.73 C72B.2@2712,2917.73 2713.43,2916.3 2760,2916.3 2788.63,2944.93 IC6B.10@2788.63,3034.92
NetC72C_1: C72C.1 C88C.2 D3C.3 IC6C.1 R42C.2 | length 381.5
  Top w8: C88C.2@2505.93,2558.12 2505.93,2507.57 2596.91,2507.57 D3C.3@2597.16,2507.81 ; D3C.3@2598.49,2509.15 D3C.3@2597.16,2507.81 ; IC6C.1@2789.12,2466.26 2727.31,2466.26 C72C.1@2712.49,2451.44 2669.98,2451.44 2665.76,2455.66 2665.76,2483.48 2641.43,2507.81 D3C.3@2597.16,2507.81
NetC72C_2: C72C.2 C85C.2 D1C.3 IC6C.10 R34C.2 | length 532.7
  Top w8: R34C.2@2501.2,2692.84 C85C.2@2501.2,2632.84 2538.25,2632.84 2541.41,2629.69 2541.41,2592.29 2561.09,2572.6 D1C.3@2598.49,2572.6 2628.77,2572.6 2630.49,2570.87 2630.49,2545.87 2654.06,2522.31 C72C.2@2712.49,2522.31 2713.93,2520.87 2760.49,2520.87 2789.12,2549.5 IC6C.10@2789.12,2639.49
NetC72D_1: C72D.1 C88D.2 D3D.3 IC6D.1 R42D.2 | length 381.5
  Top w8: C88D.2@2505.43,2166.14 2505.43,2115.59 2596.42,2115.59 D3D.3@2596.66,2115.83 ; D3D.3@2598,2117.17 D3D.3@2596.66,2115.83 ; IC6D.1@2788.63,2074.28 2726.82,2074.28 C72D.1@2712,2059.46 2669.49,2059.46 2665.27,2063.68 2665.27,2091.5 2640.94,2115.83 D3D.3@2596.66,2115.83
NetC72D_2: C72D.2 C85D.2 D1D.3 IC6D.10 R34D.2 | length 532.7
  Top w8: R34D.2@2500.71,2300.87 C85D.2@2500.71,2240.87 2537.76,2240.87 2540.91,2237.71 2540.91,2200.31 2560.6,2180.62 D1D.3@2598,2180.62 2628.28,2180.62 2630,2178.9 2630,2153.9 2653.57,2130.33 C72D.2@2712,2130.33 2713.43,2128.9 2760,2128.9 2788.63,2157.53 IC6D.10@2788.63,2247.51
NetC72E_1: C72E.1 C88E.2 D3E.3 IC6E.1 R42E.2 | length 381.5
  Top w8: C88E.2@2505.43,1772.44 2505.43,1721.89 2596.42,1721.89 D3E.3@2596.66,1722.13 ; D3E.3@2598,1723.47 D3E.3@2596.66,1722.13 ; IC6E.1@2788.63,1680.58 2726.82,1680.58 C72E.1@2712,1665.76 2669.49,1665.76 2665.27,1669.98 2665.27,1697.8 2640.94,1722.13 D3E.3@2596.66,1722.13
NetC72E_2: C72E.2 C85E.2 D1E.3 IC6E.10 R34E.2 | length 532.7
  Top w8: R34E.2@2500.71,1907.17 C85E.2@2500.71,1847.17 2537.76,1847.17 2540.91,1844.01 2540.91,1806.61 2560.6,1786.92 D1E.3@2598,1786.92 2628.28,1786.92 2630,1785.2 2630,1760.2 2653.57,1736.63 C72E.2@2712,1736.63 2713.43,1735.2 2760,1735.2 2788.63,1763.83 IC6E.10@2788.63,1853.81
NetC72F_1: C72F.1 C88F.2 D3F.3 IC6F.1 R42F.2 | length 381.5
  Top w8: C88F.2@2505.43,1378.74 2505.43,1328.19 2596.42,1328.19 D3F.3@2596.66,1328.43 ; D3F.3@2598,1329.77 D3F.3@2596.66,1328.43 ; IC6F.1@2788.63,1286.88 2726.82,1286.88 C72F.1@2712,1272.06 2669.49,1272.06 2665.27,1276.28 2665.27,1304.1 2640.94,1328.43 D3F.3@2596.66,1328.43
NetC72F_2: C72F.2 C85F.2 D1F.3 IC6F.10 R34F.2 | length 532.7
  Top w8: R34F.2@2500.71,1513.47 C85F.2@2500.71,1453.47 2537.76,1453.47 2540.91,1450.31 2540.91,1412.91 2560.6,1393.22 D1F.3@2598,1393.22 2628.28,1393.22 2630,1391.5 2630,1366.5 2653.57,1342.93 C72F.2@2712,1342.93 2713.43,1341.5 2760,1341.5 2788.63,1370.13 IC6F.10@2788.63,1460.11
NetC72G_1: C72G.1 C88G.2 D3G.3 IC6G.1 R42G.2 | length 381.5
  Top w8: C88G.2@2505.43,985.04 2505.43,934.49 2596.42,934.49 D3G.3@2596.66,934.73 ; D3G.3@2598,936.07 D3G.3@2596.66,934.73 ; IC6G.1@2788.63,893.18 2726.82,893.18 C72G.1@2712,878.36 2669.49,878.36 2665.27,882.58 2665.27,910.4 2640.94,934.73 D3G.3@2596.66,934.73
NetC72G_2: C72G.2 C85G.2 D1G.3 IC6G.10 R34G.2 | length 532.7
  Top w8: R34G.2@2500.71,1119.76 C85G.2@2500.71,1059.76 2537.76,1059.76 2540.91,1056.61 2540.91,1019.21 2560.6,999.52 D1G.3@2598,999.52 2628.28,999.52 2630,997.8 2630,972.8 2653.57,949.23 C72G.2@2712,949.23 2713.43,947.8 2760,947.8 2788.63,976.42 IC6G.10@2788.63,1066.41
NetC72H_1: C72H.1 C88H.2 D3H.3 IC6H.1 R42H.2 | length 381.5
  Top w8: C88H.2@2505.43,591.34 2505.43,540.79 2596.42,540.79 D3H.3@2596.66,541.03 ; D3H.3@2598,542.37 D3H.3@2596.66,541.03 ; IC6H.1@2788.63,499.48 2726.82,499.48 C72H.1@2712,484.66 2669.49,484.66 2665.27,488.88 2665.27,516.7 2640.94,541.03 D3H.3@2596.66,541.03
NetC72H_2: C72H.2 C85H.2 D1H.3 IC6H.10 R34H.2 | length 532.7
  Top w8: R34H.2@2500.71,726.06 C85H.2@2500.71,666.06 2537.76,666.06 2540.91,662.91 2540.91,625.51 2560.6,605.82 D1H.3@2598,605.82 2628.28,605.82 2630,604.09 2630,579.09 2653.57,555.53 C72H.2@2712,555.53 2713.43,554.09 2760,554.09 2788.63,582.72 IC6H.10@2788.63,672.71
NetC73A_2: C73A.2 IC12A.3 R73A.2 RN2A.1 RN2A.4 | length 732
  Top w8: C73A.2@3107.28,3495.08 C73A.2@3107.28,3504.92 3166.34,3504.92 R73A.2@3167.32,3503.94 3167.32,3473.43 3161.2,3467.31 3152.77,3467.31 RN2A.4@3152.77,3424.23 3152.77,3381.68 3192.91,3341.54 3222.44,3341.54 v1@3238.19,3325.79 ; v1(3240.16,3325.79) v1@3238.19,3325.79 ; v1(3282.48,3361.22) 3302.77,3381.51 RN2A.1@3302.77,3424.23 ; v1(3417.32,3319.88) 3383.86,3319.88 3363.19,3299.21 3264.76,3299.21 v1@3238.19,3325.79 ; v1(3417.49,3276.73) 3418.31,3275.92 IC12A.3@3418.31,3229.47
  L3 w8: v1(3240.16,3325.79) 3247.05,3325.79 v1(3282.48,3361.22) ; v1(3417.32,3319.88) 3417.49,3319.72 v1(3417.49,3276.73)
NetC73B_2: C73B.2 IC12B.3 R73B.2 RN2B.1 RN2B.4 | length 717.5
  Top w8: C73B.2@3107.28,3111.22 3108.27,3110.24 3165.35,3110.24 3152.77,3097.65 RN2B.4@3152.77,3030.53 3152.77,2979.33 3171.61,2960.49 3180.26,2960.49 3192.91,2947.83 3222.44,2947.83 v1(3243.6,2926.67) 3264.76,2905.51 3363.19,2905.51 3383.86,2926.18 v1(3417.32,2926.18) ; v1(3274.61,2961.61) 3300.2,2987.2 3300.2,3027.95 RN2B.1@3302.77,3030.53 ; v1(3417.49,2883.03) 3418.31,2882.22 IC12B.3@3418.31,2835.77
  L3 w8: v1(3243.6,2926.67) 3243.6,2930.61 v1(3274.61,2961.61) ; v1(3417.32,2926.18) 3417.49,2926.01 v1(3417.49,2883.03)
NetC73C_2: C73C.2 IC12C.3 R73C.2 RN2C.1 RN2C.4 | length 713.9
  Top w8: C73C.2@3107.78,2715.8 3108.02,2715.55 R73C.2@3167.32,2715.55 3153.27,2701.49 RN2C.4@3153.27,2635.1 3153.27,2584.65 3172.85,2565.06 3180.75,2565.06 3193.41,2552.41 3222.93,2552.41 3265.26,2510.09 3363.68,2510.09 3384.35,2530.76 v1(3417.82,2530.76) ; v1(3271.65,2572.83) 3271.65,2584.65 3303.27,2616.26 RN2C.1@3303.27,2635.1 ; v1(3417.98,2487.61) 3418.8,2486.79 IC12C.3@3418.8,2440.35
  L3 w8: v1(3238.19,2539.37) v1(3271.65,2572.83) ; v1(3417.82,2530.76) 3417.98,2530.59 v1(3417.98,2487.61)
NetC73D_2: C73D.2 IC12D.3 R73D.2 RN2D.1 RN2D.4 | length 717.1
  Top w8: C73D.2@3107.28,2323.82 3111.22,2319.88 R73D.2@3167.32,2319.88 3152.77,2305.33 RN2D.4@3152.77,2243.13 3152.77,2192.91 3172.6,2173.09 3180.26,2173.09 3192.91,2160.43 3222.44,2160.43 v1(3239.17,2143.7) 3264.76,2118.11 3363.19,2118.11 3383.86,2138.78 v1(3417.32,2138.78) ; v1(3273.62,2175.2) 3302.77,2204.35 RN2D.1@3302.77,2243.13 ; v1(3417.49,2095.63) 3418.31,2094.81 IC12D.3@3418.31,2048.37
  L3 w8: v1(3239.17,2143.7) 3242.13,2143.7 v1(3273.62,2175.2) ; v1(3417.32,2138.78) 3417.49,2138.61 v1(3417.49,2095.63)
NetC73E_2: C73E.2 IC12E.3 R73E.2 RN2E.1 RN2E.4 | length 719.9
  Top w8: C73E.2@3107.28,1930.12 3108.27,1929.13 R73E.2@3167.32,1929.13 3152.77,1914.58 RN2E.4@3152.77,1849.43 3152.77,1798.23 3171.61,1779.39 3180.26,1779.39 3192.91,1766.73 3222.44,1766.73 3264.76,1724.41 3363.19,1724.41 3383.86,1745.08 v1(3417.32,1745.08) ; v1(3274.61,1776.57) 3301.18,1803.15 3301.18,1847.83 RN2E.1@3302.77,1849.43 ; v1(3417.49,1701.93) 3418.31,1701.11 IC12E.3@3418.31,1654.67
  L3 w8: v1(3242.13,1750) 3248.03,1750 v1(3274.61,1776.57) ; v1(3417.32,1745.08) 3417.49,1744.91 v1(3417.49,1701.93)
NetC73F_2: C73F.2 IC12F.3 R73F.2 RN2F.1 RN2F.4 | length 726.2
  Top w8: C73F.2@3107.28,1536.42 R73F.2@3166.34,1536.42 3152.77,1522.85 RN2F.4@3152.77,1455.72 3152.77,1394.47 3161.56,1385.69 3180.26,1385.69 3192.91,1373.03 3222.44,1373.03 3264.76,1330.71 3363.19,1330.71 3383.86,1351.38 v1(3417.32,1351.38) ; v1(3274.61,1382.87) 3302.77,1411.04 RN2F.1@3302.77,1455.72 ; v1(3417.49,1308.23) 3418.31,1307.41 IC12F.3@3418.31,1260.97
  L3 w8: v1(3247.46,1349.43) 3247.46,1355.72 v1(3274.61,1382.87) ; v1(3417.32,1351.38) 3417.49,1351.21 v1(3417.49,1308.23)
NetC73G_2: C73G.2 IC12G.3 R73G.2 RN2G.1 RN2G.4 | length 724.7
  Top w8: C73G.2@3107.28,1142.72 3108.27,1141.73 R73G.2@3167.32,1141.73 3152.77,1127.18 RN2G.4@3152.77,1062.02 3152.77,1000.77 3161.56,991.98 3180.26,991.98 3192.91,979.33 3222.44,979.33 v1(3240.16,961.61) 3264.76,937.01 3363.19,937.01 3383.86,957.68 v1(3417.32,957.68) ; v1(3274.61,995.08) 3302.77,1023.24 RN2G.1@3302.77,1062.02 ; v1(3417.49,914.53) 3418.31,913.71 IC12G.3@3418.31,867.27
  L3 w8: v1(3240.16,961.61) 3241.14,961.61 v1(3274.61,995.08) ; v1(3417.32,957.68) 3417.49,957.51 v1(3417.49,914.53)
NetC73H_2: C73H.2 IC12H.3 R73H.2 RN2H.1 RN2H.4 | length 721.1
  Top w8: C73H.2@3108.27,748.03 R73H.2@3166.34,748.03 3152.77,734.46 RN2H.4@3152.77,668.32 3152.77,607.07 3161.56,598.28 3180.26,598.28 3192.91,585.63 3222.44,585.63 3264.76,543.31 3363.19,543.31 3383.86,563.98 v1(3417.32,563.98) ; v1(3276.57,605.31) 3302.77,631.51 RN2H.1@3302.77,668.32 ; v1(3417.49,520.83) 3418.31,520.01 IC12H.3@3418.31,473.57
  L3 w8: v1(3238.19,571.85) 3243.11,571.85 v1(3276.57,605.31) ; v1(3417.32,563.98) 3417.49,563.81 v1(3417.49,520.83)
NetC74A_2: C74A.2 IC12A.5 R50A.2 | length 156.7
  Top w10: IC12A.5@3443.9,3402.7 3443.9,3495.08 C74A.2@3437.01,3501.97 3451.77,3516.73 R50A.2@3485.43,3516.73
NetC74B_2: C74B.2 IC12B.5 R50B.2 | length 156.7
  Top w10: IC12B.5@3443.9,3009 3443.9,3101.38 C74B.2@3437.01,3108.27 3451.77,3123.03 R50B.2@3485.43,3123.03
NetC74C_2: C74C.2 IC12C.5 R50C.2 | length 156.7
  Top w10: IC12C.5@3444.39,2613.58 3444.39,2705.95 C74C.2@3437.5,2712.84 3452.27,2727.61 R50C.2@3485.93,2727.61
NetC74D_2: C74D.2 IC12D.5 R50D.2 | length 156.7
  Top w10: IC12D.5@3443.9,2221.6 3443.9,2313.98 C74D.2@3437.01,2320.87 3451.77,2335.63 R50D.2@3485.43,2335.63
NetC74E_2: C74E.2 IC12E.5 R50E.2 | length 156.7
  Top w10: IC12E.5@3443.9,1827.9 3443.9,1920.28 C74E.2@3437.01,1927.17 3451.77,1941.93 R50E.2@3485.43,1941.93
NetC74F_2: C74F.2 IC12F.5 R50F.2 | length 156.7
  Top w10: IC12F.5@3443.9,1434.2 3443.9,1526.57 C74F.2@3437.01,1533.46 3451.77,1548.23 R50F.2@3485.43,1548.23
NetC74G_2: C74G.2 IC12G.5 R50G.2 | length 156.7
  Top w10: IC12G.5@3443.9,1040.5 3443.9,1132.87 C74G.2@3437.01,1139.76 3451.77,1154.53 R50G.2@3485.43,1154.53
NetC74H_2: C74H.2 IC12H.5 R50H.2 | length 156.7
  Top w10: IC12H.5@3443.9,646.8 3443.9,739.17 C74H.2@3437.01,746.06 3451.77,760.83 R50H.2@3485.43,760.83
NetC75_2: C75.2 IC5.3 RN4.1 RN4.5 | length 832.4
  Top w8: C75.2@3917.32,2783.46 3863.19,2783.46 3852.36,2772.64 3852.36,2715.75 RN4.5@3846.46,2709.84 3843.7,2712.6 3792.32,2712.6 3765.61,2685.88 3765.61,2485.38 3818.9,2432.09 IC5.3@3868.11,2432.09 3931.11,2432.09 3972.44,2473.42 3972.44,2534.45 3997.83,2559.84 RN4.1@4059.06,2559.84
NetC76_2: C76.2 IC5.5 RN3.3 RN3.5 | length 473
  Top w6: C76.2@3769.69,2332.68 3915.35,2332.68 ; IC5.5@4041.34,2406.5 3989.17,2406.5 3915.35,2332.68 ; RN3.3@4065.94,2283.86 3964.17,2283.86 3915.35,2332.68
NetC80_2: C80.2 IC1.6 IC31.6 R77.1 | length 507.2
  Top w6: IC31.6@3809.06,943.06 3813.25,938.87 3813.25,898.87 3822.11,890.01 3964.63,890.01 3975.23,879.41 4002.2,879.41 v1(4021.65,898.87) IC1.6@4021.65,945.87 4021.65,983.72 4035.43,997.5 4096.73,997.5 C80.2@4104.33,1005.1 4104.33,974.43 4124.21,954.54 R77.1@4125,954.54 R77.1@4125.79,954.54
NetC83_1: C83.1 IC34.5 | length 74.9
  Top w5: C83.1@4485.24,840.55 4485.24,841.54 4508.86,865.16 IC34.5@4508.86,905.66
NetC114_1: C114.1 IC16.4 | length 270.1
  Top w8: C114.1@4348.42,1289.37 4348.42,1251.97 4388.92,1211.47 4505.84,1211.47 4514.84,1220.47 4555.31,1220.47 IC16.4@4559.06,1224.21
NetC116_1: C116.1 IC4.3 | length 70.4
  Top w5: IC4.3@4728.35,1871.61 4774.96,1871.61 4791.17,1855.41 C116.1@4791.17,1854.52
NetD6_1: D6.1 IC1.1 IC26.7 IC31.1 R57.1 | length 3646.7
  Top w6: IC31.1@3759.06,769.83 3759.06,815.11 3762.57,818.62 3964.82,818.62 3972.42,811.02 ; IC1.1@3972.42,775.53 3972.42,811.02 ; v1(4596.46,1190.94) 4605.23,1182.17 4605.23,1170.41 4599.86,1165.04 4599.86,865.7 4569.84,835.68 4569.84,811.02 4556.6,797.79 4193.78,797.79 4152.98,838.58 3995.22,838.58 3972.42,815.78 3972.42,811.02 ; v1(4744.09,1190.94) 4744.09,1192.59 4733.14,1203.54 4733.14,1418.98 4759.84,1445.68 4784.07,1445.68 4863.66,1525.27 4863.66,1619.76 4935.57,1691.67 4935.57,1925.3 4897.24,1963.63 D6.1@4897.24,2007.87 4946.94,2007.87 4980.62,2041.56 4980.62,2132.12 v1(4978.71,2134.03) ; v1(5212.47,2356.24) 5213.25,2356.24 5233.46,2376.45 5449.8,2376.45 5517.72,2444.37 5517.72,2491.35 5535.93,2509.57 5570.37,2509.57 5589.59,2528.79 5589.59,2557.99 5597.12,2565.52 R57.1@5597.12,2603.93
  Top w10: IC26.7@5582.61,2678.53 5597.14,2678.53 5597.14,2677.21 5599.61,2674.75 5600.54,2674.75 5606.39,2668.89 5606.39,2613.21 R57.1@5597.12,2603.93
  L3 w6: v1(4596.46,1190.94) v1(4744.09,1190.94) ; v1(4978.71,2134.03) 4999.55,2113.19 5050.22,2113.19 5212.47,2275.44 v1(5212.47,2356.24)
NetD6_2: D6.2 IC13.5 IC14.3 IC15.1 IC34.4 R18.1 R52.2 | length 2797
  Top w6: v1(4377.28,889.5) 4377.28,893.18 4389.76,905.66 IC34.4@4398.62,905.66 ; v1(4665.35,1171.26) 4669.29,1167.32 IC14.3@4669.29,1139.76 ; IC13.5@4738.15,2025.37 4738.15,1987.11 4756.75,1968.5 4787.4,1968.5 ; D6.2@4807.48,2007.87 4807.48,1988.58 4787.4,1968.5 ; R52.2@4960.63,484.25 R52.2@4950.79,474.41 4895.67,474.41 4887.99,482.09 IC15.1@4887.99,549.21 4887.99,598.62 4921.78,632.41 4921.78,718.97 4914.37,726.38 4912.4,726.38 4889.76,749.02 4863.19,749.02 4836.61,775.59 4836.61,826.77 4833.66,829.72 R18.1@4833.66,952.76 4833.66,981.3 4881.89,1029.53 4881.89,1165.35 4856.3,1190.94 4769.33,1190.94 4751.49,1173.1 4736.7,1173.1 4722.57,1187.24 4722.57,1198.56 4722.14,1198.98 4722.14,1423.54 4755.28,1456.68 4779.52,1456.68 4852.66,1529.83 4852.66,1624.31 4883.54,1655.2 4883.54,1664.01 4924.57,1705.04 4924.57,1883.3 4877.39,1930.48 4825.43,1930.48 4787.4,1968.5
  L3 w6: v1(4549.41,1165.43) 4638.09,1165.43 4639.47,1164.05 4644.44,1164.05 4651.65,1171.26 v1(4665.35,1171.26) 4734.86,1171.26 4739.86,1166.26 v1(4740.79,1166.26)
  Bot w6: v1(4377.28,889.5) 4397.98,910.2 4397.98,1092.86 4466.91,1161.79 4545.89,1161.79 4549.41,1165.3 v1(4549.41,1165.43)
NetIC2_23: IC2.23 R2.2 T9.3 | length 1494.1
  Top w5: IC2.23@3953.54,1520.09 3953.54,1482.89 3957.24,1479.19 v1(3957.24,1470.45)
  Top w6: R2.2@4697.31,786.61 R2.2@4713.2,802.51 4752.7,842.01 T9.3@4778.93,842.01
  Bot w5: v1(3957.24,1470.45) 3964.6,1463.09 3964.6,1414.05 4057.57,1321.08 4069.58,1321.08 4189.2,1201.47 4537.89,1201.47 4602.58,1136.78 4778.57,1136.78 4809.06,1106.3 4809.06,951.21 4742.73,884.88 v1(4742.73,826.77)
NetIC2_24: IC2.24 IC23.5 | length 2432.9
  Top w5: IC2.24@3973.23,1520.09 3973.23,1489.64 v1(3974.6,1488.26) ; v1(5604.82,1326.77) 5618.05,1340 IC23.5@5725.54,1340
  Bot w5: v1(3974.6,1488.26) 3974.6,1418.19 4061.71,1331.08 4073.73,1331.08 4191.84,1212.97 4540.53,1212.97 4606.72,1146.78 4788.26,1146.78 4824.8,1110.24 4824.8,905.35 4871.06,859.09 5008.99,859.09 5193.36,1043.47 5193.36,1092.36 5237.78,1136.78 5414.83,1136.78 v1(5604.82,1326.77)
NetIC2_25: IC2.25 R11.2 | length 95.9
  Top w10: IC2.25@3992.91,1520.09 3994.45,1518.56 3994.45,1496.21 4013.3,1477.36 4024.61,1477.36 R11.2@4048.23,1453.74
NetIC2_43: IC2.43 R10.1 | length 228.7
  Top w10: v1(3956.69,2027.56) R10.1@3977.56,2027.56 ; IC2.43@3973.23,1829.15 3973.23,1866.35 v1(3976.38,1869.5)
  L3 w10: v1(3956.69,2027.56) 3976.38,2007.87 v1(3976.38,1869.5)
NetIC3_2: IC3.2 R8.2 | length 164.7
  Top w8: IC3.2@5933.46,3367.13 5994.69,3305.91 R8.2@6072.83,3305.91
NetIC3_6: IC3.6 R7.1 R19.2 | length 241
  Top w8: R19.2@4935.79,3118.87 4935.79,3048.46 R7.1@4940.94,3043.31 4942.91,3043.31 5019.93,3120.32 5019.93,3153.59 IC3.6@5033.46,3167.13
NetIC4_4: IC4.4 IC32.4 R26.1 R27.2 | length 291.9
  Top w10: R26.1@4557.99,1874.01 4560.82,1871.18 IC4.4@4611.22,1871.18 ; IC4.4@4621.56,1871.18 4633.3,1871.18 4653.7,1850.78 4653.7,1750.53 4634.84,1731.67 IC32.4@4624.02,1731.67
  Top w20: IC4.4@4610.79,1871.18 4611.22,1871.61 IC4.4@4622.05,1871.61 4621.56,1872.1 4621.56,1918.46 R27.2@4621.06,1918.95
NetIC5_2: IC5.2 RN4.6 | length 351.3
  Top w8: RN4.6@3846.46,2659.84 3847.98,2658.32 3914.51,2658.32 3954.72,2618.11 3954.72,2494.02 3918.38,2457.68 IC5.2@3868.11,2457.68
NetIC5_6: IC5.6 R72.1 RN4.2 | length 649.4
  Top w6: R72.1@3988.19,2848.43 4048.23,2848.43 4100.39,2796.26 4100.39,2615.16 4095.08,2609.84 RN4.2@4059.06,2609.84 ; v1(3989.17,2428.15) 3993.11,2432.09 IC5.6@4041.34,2432.09
  Top w8: v1(4014.76,2610.24) 4015.16,2609.84 RN4.2@4059.06,2609.84
  L3 w8: v1(3989.17,2428.15) 3989.17,2484.25 4014.76,2509.84 v1(4014.76,2610.24)
NetIC6A_7: IC6A.7 RN1A.1 | length 360.5
  Top w8: IC6A.7@2847.69,3428.61 2847.69,3462.01 2860.68,3475 2885,3475 2898.87,3461.13 2898.87,3316.13 2936,3279 RN1A.1@2936,3211.7
NetIC6B_7: IC6B.7 RN1B.1 | length 360.5
  Top w8: IC6B.7@2847.69,3034.92 2847.69,3068.31 2860.68,3081.3 2885,3081.3 2898.87,3067.43 2898.87,2922.43 2936,2885.3 RN1B.1@2936,2818
NetIC6C_7: IC6C.7 RN1C.1 | length 360.5
  Top w8: IC6C.7@2848.18,2639.49 2848.18,2672.88 2861.17,2685.87 2885.49,2685.87 2899.36,2672.01 2899.36,2527.01 2936.49,2489.87 RN1C.1@2936.49,2422.58
NetIC6D_7: IC6D.7 RN1D.1 | length 360.5
  Top w8: IC6D.7@2847.69,2247.51 2847.69,2280.91 2860.68,2293.9 2885,2293.9 2898.87,2280.03 2898.87,2135.03 2936,2097.9 RN1D.1@2936,2030.6
NetIC6E_7: IC6E.7 RN1E.1 | length 360.5
  Top w8: IC6E.7@2847.69,1853.81 2847.69,1887.21 2860.68,1900.2 2885,1900.2 2898.87,1886.33 2898.87,1741.33 2936,1704.2 RN1E.1@2936,1636.9
NetIC6F_7: IC6F.7 RN1F.1 | length 360.5
  Top w8: IC6F.7@2847.69,1460.11 2847.69,1493.5 2860.68,1506.5 2885,1506.5 2898.87,1492.63 2898.87,1347.63 2936,1310.5 RN1F.1@2936,1243.2
NetIC6G_7: IC6G.7 RN1G.1 | length 360.5
  Top w8: IC6G.7@2847.69,1066.41 2847.69,1099.8 2860.68,1112.8 2885,1112.8 2898.87,1098.93 2898.87,953.93 2936,916.8 RN1G.1@2936,849.5
NetIC6H_7: IC6H.7 RN1H.1 | length 360.5
  Top w8: IC6H.7@2847.69,672.71 2847.69,706.1 2860.68,719.09 2885,719.09 2898.87,705.23 2898.87,560.23 2936,523.09 RN1H.1@2936,455.8
NetIC7_4: IC7.4 IC33.4 R53.1 R54.2 | length 297.8
  Top w6: IC33.4@4360.24,1639.85 4360.24,1629.02 4381.81,1607.45 v1(4392.8,1607.45) ; v1(4503.03,1604.41) 4503.03,1608.11 4496.85,1614.29 R53.1@4496.85,1643.7 R54.2@4538.58,1643.7 4541.36,1640.92 IC7.4@4541.36,1594.46
  Bot w6: v1(4392.8,1607.45) 4394.31,1605.93 4501.51,1605.93 v1(4503.03,1604.41)
NetIC8_5: IC8.5 R24.1 R28.2 | length 95.9
  Top w5: IC8.5@5364.05,2603.93 5392.79,2603.93 R24.1@5412.47,2584.24 R28.2@5412.47,2623.61
NetIC8_9: IC8.9 L3.1 | length 141.7
  Top w5: L3.1@5152.32,2575.39 L3.1@5179.43,2548.28 ; IC8.9@5277.96,2548.28 IC8.9@5281.37,2544.87
  Top w10: L3.1@5179.43,2548.28 IC8.9@5277.96,2548.28
NetIC10_9: IC10.9 IC11.14 | length 3506.1
  Top w5: IC11.14@3974.6,454.98 v1(4017.98,454.98) ; v1(4073.21,3295.87) IC10.9@4073.21,3339.26
  Bot w5: v1(4017.98,454.98) 3932.28,454.98 3913.87,473.39 3913.87,495.58 3848.43,561.02 3848.43,570.87 3661.26,758.03 3661.26,1718.5 3705.95,1763.2 3705.95,1768.56 3702.07,1772.44 3702.07,1795.76 3705.95,1799.64 3705.95,1897.6 3661.26,1942.29 3661.26,2436.76 3661.37,2436.87 3661.37,2468.64 3661.26,2468.75 3661.26,3153.99 3706.24,3198.98 3961.85,3198.98 3988.87,3226 4022.54,3226 4073.21,3276.67 v1(4073.21,3295.87)
NetIC10_13: IC10.13 IC11.13 IC15.7 R51.2 | length 4687.2
  Top w5: v1(3917.32,354.33) 3917.32,314.96 3976.38,255.91 v1(4212.6,255.91) ; v1(3931.21,429.39) IC11.13@3974.6,429.39 ; v1(3970.85,3295.87) IC10.13@3970.85,3339.26 ; IC15.7@4837.99,336.61 4837.99,294.69 v1(4832.68,289.37) 4847.64,274.41 R51.2@4862.2,274.41
  Bot w5: v1(3917.32,354.33) 3920.53,357.54 3920.53,400.88 3917.32,404.09 3917.32,415.5 v1(3931.21,429.39) 3921,429.39 3913.69,436.71 3913.69,459.43 3903.87,469.25 3903.87,491.44 3651.26,744.05 3651.26,1722.65 3692.07,1763.45 3692.07,1799.9 3695.95,1803.78 3695.95,1893.46 3651.26,1938.15 3651.26,2440.9 3651.37,2441.02 3651.37,2464.5 3651.26,2464.61 3651.26,3159.13 3708.81,3216.69 3965.42,3216.69 3984.73,3236 4018.4,3236 4033.09,3250.69 4033.09,3265.06 4022.93,3275.22 3991.51,3275.22 v1(3970.85,3295.87) ; v1(4212.6,255.91) 4261.81,206.69 4750,206.69 v1(4832.68,289.37)
NetIC12A_1: IC12A.1 R14A.1 RN1A.7 RN2A.7 | length 776.5
  Top w8: RN1A.7@2986,3424.3 2986,3375.22 3027.56,3333.66 3182.4,3333.66 3187.53,3328.54 3207.32,3328.54 3252.77,3283.09 ; RN2A.7@3252.77,3211.63 3252.77,3283.09 ; IC12A.1@3367.13,3229.47 IC12A.1@3367.13,3253 ; R14A.1@3510.2,3252.21 3489.34,3252.21 3480.68,3260.87 3478.3,3260.87 3439.82,3299.35 3384.91,3299.35 3367.13,3281.57 IC12A.1@3367.13,3253 ; 3252.77,3283.09 3254.28,3284.59 3292.25,3284.59 3315.77,3261.07 3315.77,3259.46 3322.23,3253 IC12A.1@3367.13,3253
NetIC12A_2: IC12A.2 RN1A.2 RN1A.3 | length 589.7
  Top w8: v1(2985.24,3278.54) 2985.24,3212.46 RN1A.2@2986,3211.7 ; RN1A.3@3036,3211.7 3036,3279.11 v1(3036.42,3279.53) ; IC12A.2@3392.72,3229.47 v1(3392.72,3280.51)
  L3 w8: v1(2985.24,3278.54) 2987.2,3280.51 3025.52,3280.51 ; v1@3036.42,3278.4 3082.54,3278.4 3084.65,3280.51 3199.17,3280.51 3200.28,3279.4 3271.46,3279.4 3276.64,3284.59 3292.25,3284.59 3297.44,3279.4 3391.61,3279.4 v1(3392.72,3280.51)
NetIC12A_6: IC12A.6 RN2A.2 RN2A.3 | length 435.7
  Top w8: RN2A.3@3202.77,3424.23 3202.77,3362.61 3208.09,3357.3 3237.61,3357.3 ; RN2A.2@3252.77,3424.23 3247.46,3418.91 3247.46,3367.14 3237.61,3357.3 ; IC12A.6@3418.31,3402.7 3418.31,3348.57 3405.51,3335.77 3386.64,3335.77 3383.75,3332.88 3378.47,3332.88 3363.52,3317.93 3276.98,3317.93 3237.61,3357.3
NetIC12A_7: IC12A.7 R16A.1 RN2A.6 | length 510.4
  Top w8: RN2A.6@3202.77,3211.63 3202.77,3292.93 v1(3208.09,3298.24) ; v1(3316.35,3347.46) 3379.94,3347.46 3392.72,3360.24 IC12A.7@3392.72,3402.7 3392.72,3448.82 v1(3391.73,3449.8) ; v1(3475.39,3452.76) 3479.18,3456.54 R16A.1@3510.2,3456.54
  L3 w8: v1(3208.09,3298.24) 3267.14,3298.24 v1(3316.35,3347.46) ; v1(3391.73,3449.8) 3472.44,3449.8 v1(3475.39,3452.76)